# Altium PCB DC-Motor-Driver-v1.0.PcbDoc (part 2 of 5)
Units mil, origin at the board's own origin, x right, y up, seen from the top; angles counter-clockwise.
Board outline 1968.5 x 1574.8 mil, 4 copper layers (Top Layer, Signal 1, Signal 2, Bottom Layer), stack 62.055 mil thick; 133 components, 124 nets, 619 pads, 342 vias.
Unrouted connection lines stored in the file: 5.
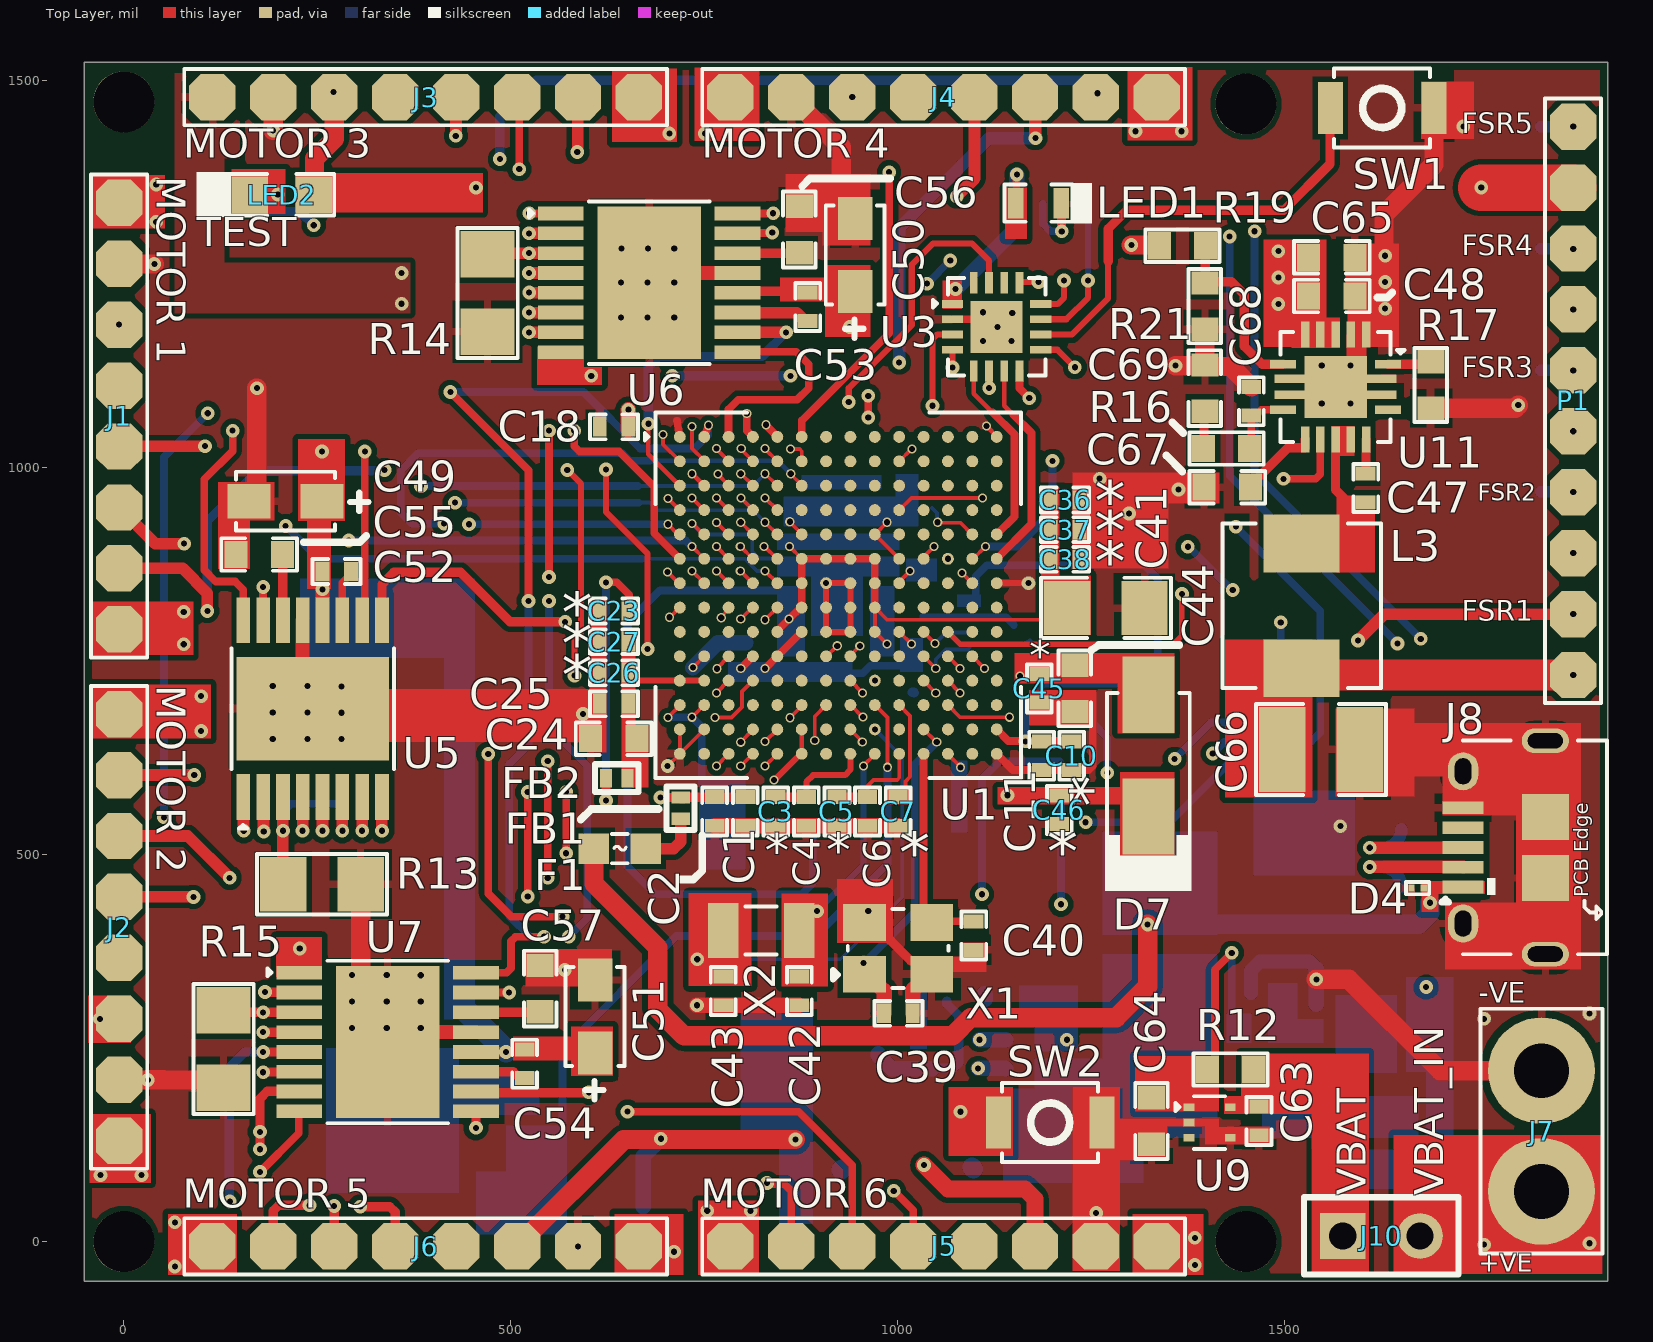
[diagram p0: Top Layer view]

## Part data (continued)
D2 D5: "Schottky Barrier Diode SK36, DO-214AB, 3A/60V", Average Rectified Current=3A, Case/Package=SMC, Forward Voltage=750mV, LCSC Part Number=C16015, Manufacturer="ON Semiconductor / Fairchild", Max Forward Surge Current (Ifsm)=100A, Max Operating Temperature=150°C, Max Repetitive Reverse Voltage (Vrrm)=60V, Max Reverse Current=500uA, Min Operating Temperature=-55°C, Package Quantity=3000, Power Dissipation=2.27W, Supplier Part Number 1=9034425P, Category="Schottky Diodes", ComponentLink1Description=https://datasheet.ciiva.com/4714/ss36-197193-4714610.pdf?src-supplier=Mouser, ComponentLink1URL=https://datasheet.ciiva.com/4714/ss36-197193-4714610.pdf?src-supplier=Mouser, ComponentLink2Description=https://datasheet.ciiva.com/16889/ss36-16889545.pdf?src-supplier=Future+Electronics, ComponentLink2URL=https://datasheet.ciiva.com/16889/ss36-16889545.pdf?src-supplier=Future+Electronics, ComponentLink3Description=https://datasheet.ciiva.com/920/ss34-920433.pdf?src-supplier=Digi-Key, ComponentLink3URL=https://datasheet.ciiva.com/920/ss34-920433.pdf?src-supplier=Digi-Key, ComponentLink4Description=https://datasheet.ciiva.com/920/ss34-920434.pdf?src-supplier=Digi-Key, ComponentLink4URL=https://datasheet.ciiva.com/920/ss34-920434.pdf?src-supplier=Digi-Key, ComponentLink5Description=https://datasheet.ciiva.com/920/ss34-920435.pdf?src-supplier=Digi-Key, ComponentLink5URL=https://datasheet.ciiva.com/920/ss34-920435.pdf?src-supplier=Digi-Key, Current=3A, Current Rating=3A, Element Configuration=Single, Forward Current=3A, Item Type=Diode, Lead Free="Lead Free", Manufacturer Part Number=SS36, Max Reverse Leakage Current=500uA, Max Reverse Voltage (DC)=60V, Max Surge Current=100A, Mount="Surface Mount", Number of Pins=2, Output Current=3A, Packaging="Tape and Reel", Peak Non-Repetitive Surge Current=100A, Polarity=Standard, Pricing 1="100=0.43800, 500=0.34200, 1000=0.27800, 3000=0.25000 (GBP)", Radiation Hardening=No, Reach SVHC Compliant=Yes, RoHS=Yes, RoHS Compliant=Yes, Series=-, Stock 1=100, Supplier 1=Rs, Voltage=60V, Voltage Rating (DC)=60V
D3: "16A 20V 7V 5V@Max Unidirectional SOT-23 TVS ROHS", LCSC Part Number=C239643, Manufacturer=WILLSEMI, Package=SOT-23, ComponentLink1Description=LCSC, ComponentLink1URL=https://www.lcsc.com/product-detail/TVS_WILLSEMI-Will-Semicon-ESD5302F-3-TR_C239643.html, Item Type=Diode, Manufacturer Part Number=ESD5302F-3/TR
D4: "TVS DIODE 5VWM 6.3VC DSN0603-2", LCSC Part Number=C477989, Manufacturer=Nexperia, Category="ESD and Circuit Protection ICs", ComponentLink1Description=http://www.farnell.com/datasheets/1961312.pdf?src-supplier=Farnell, ComponentLink1URL=http://www.farnell.com/datasheets/1961312.pdf?src-supplier=Farnell, ComponentLink2Description=https://assets.nexperia.com/documents/data-sheet/PESD5V0H1BSF.pdf?src-supplier=Digi-Key, ComponentLink2URL=https://assets.nexperia.com/documents/data-sheet/PESD5V0H1BSF.pdf?src-supplier=Digi-Key, ComponentLink3Description=http://www.farnell.com/datasheets/1961312.pdf?src-supplier=Newark, ComponentLink3URL=http://www.farnell.com/datasheets/1961312.pdf?src-supplier=Newark, Item Type=Diode, Manufacturer Part Number=PESD5V0H1BSFYL, Pricing 1="18000=0.06453, 36000=0.06278, 54000=0.06104, 90000=0.05930, 180000=0.05755, 900000=0.05581, 1800000=0.05406 (USD)", RoHS=Yes, RoHS Compliant=Yes, Stock 1=9000, Supplier 1=Avnet, Supplier Part Number 1=PESD5V0H1BSFYL
D6: "Single 3.01V~3.22V 500mW 3.1V SOD-123 Zener Diodes ROHS", LCSC Part Number=C2972805, Manufacturer=LRC, Package=SOD-123, ComponentLink1Description=LCSC, Item Type=Diode, Manufacturer Part Number=LBZT52B3V0T1G
F1: "6V 500mA 40A 1A 0603 Resettable Fuses ROHS", LCSC Part Number=C69679, Manufacturer=TECHFUSE, Category=Uncategorized, ComponentLink1Description=LCSC, ComponentLink1URL=https://www.lcsc.com/product-detail/Resettable-Fuses_TECHFUSE-SMD0603-050_C69679.html, Item Type=Fuse, Manufacturer Part Number=SMD0603-050, RoHS=No, Supplier 1=LCSC, Supplier Part Number 1=C69679
FB1 FB2: "FERRITE BEAD 120 OHM 0402 1LN", Case Code (Imperial)=0402, Case Code (Metric)=1005, Current Rating=1.3A, DC Resistance (DCR)=90mR, LCSC Part Number=C76891, Manufacturer=Murata, Max Operating Temperature=125°C, Min Operating Temperature=-55°C, Package Quantity=1, Test Frequency=100MHz, Tolerance=25%, Case/Package=0402, Category="Ferrite Beads and Chips", ComponentLink1Description=https://datasheet.ciiva.com/11800/0900766b811b5866-11800860.pdf?src-supplier=RSComponents, ComponentLink1URL=https://datasheet.ciiva.com/11800/0900766b811b5866-11800860.pdf?src-supplier=RSComponents, ComponentLink2Description=https://datasheet.ciiva.com/18093/getdatasheetpartid-195858-18093157.pdf?src-supplier=Verical, ComponentLink2URL=https://datasheet.ciiva.com/18093/getdatasheetpartid-195858-18093157.pdf?src-supplier=Verical, ComponentLink3Description=https://datasheet.ciiva.com/41425/001171686-da-01-en-chip-drossel0402-120r-1300ma-1-0x0-5mm-41425776.pdf?src-supplier=Conrad, ComponentLink3URL=https://datasheet.ciiva.com/41425/001171686-da-01-en-chip-drossel0402-120r-1300ma-1-0x0-5mm-41425776.pdf?src-supplier=Conrad, ComponentLink4Description=https://datasheet.ciiva.com/41449/001172205-da-01-en-drossel-0402-120r-11-0x0-5mm-10000st-41449495.pdf?src-supplier=Conrad, ComponentLink4URL=https://datasheet.ciiva.com/41449/001172205-da-01-en-drossel-0402-120r-11-0x0-5mm-10000st-41449495.pdf?src-supplier=Conrad, ComponentLink5Description=https://datasheet.ciiva.com/1012/l0110e-1012435.pdf?src-supplier=Digi-Key, ComponentLink5URL=https://datasheet.ciiva.com/1012/l0110e-1012435.pdf?src-supplier=Digi-Key, ComponentLink6Description=https://datasheet.ciiva.com/1012/l0110e-1012434.pdf?src-supplier=Digi-Key, ComponentLink6URL=https://datasheet.ciiva.com/1012/l0110e-1012434.pdf?src-supplier=Digi-Key, ComponentLink7Description=https://datasheet.ciiva.com/1012/l0110e-1012436.pdf?src-supplier=Digi-Key, ComponentLink7URL=https://datasheet.ciiva.com/1012/l0110e-1012436.pdf?src-supplier=Digi-Key, Core Material=Ferrite, DC Current=1.3A, DC Resistance-Max=90mR, Depth=0.55mm, Height=0.5mm, Impedance=120R, Item Type="Ferrite Bead", Lead Free="Lead Free", Length=1mm, Manufacturer Part Number=BLM15PD121SN1D, Material=Steel,Ferrite, Max Current Rating=1.3A, Max DC Current=1.3A, Military Standard=Not, Number of Circuits=1, Number of Lines=1, Number of Pins=2, Packaging="Tape and Reel", Pricing 1="10000=0.03238, 20000=0.03063, 40000=0.02888, 60000=0.02713, 80000=0.02538, 100000=0.02363, 1000000=0.02188 (USD)", Radiation Hardening=No, Reach SVHC Compliant=Yes, RoHS=Yes, RoHS Compliant=Yes, Series=BLM15PD, Stock 1=300000, Supplier 1=Avnet, Supplier Part Number 1=BLM15PD121SN1D, Termination=SMD/SMT, Width=0.5mm
J7: library part "Through Hole Pads 2", "3.96mm Pitch Through Hole Pads 2", Item Type="Through Hole Pads", Manufacturer Part Number="Through Hole Pads 2"
J8: "CONN RCPT USB2.0 MICRO B SMD R/A", Color=Black, Current Rating=1.8A, Flammability Rating="UL94 V-0", Insulation Resistance=1GR, LCSC Part Number=C132563, Manufacturer="Amphenol FCI", Max Operating Temperature=85°C, Max Voltage Rating (AC)=100V, Min Operating Temperature=-55°C, Package Quantity=9600, Supplier Part Number 1=609-4618-1-ND, ComponentLink1Description=http://www.amphenol-icc.com/media/wysiwyg/files/drawing/10118194.pdf?src-supplier=Digi-Key, ComponentLink1URL=http://www.amphenol-icc.com/media/wysiwyg/files/drawing/10118194.pdf?src-supplier=Digi-Key, ComponentLink2Description=https://cdn.amphenol-icc.com/media/wysiwyg/files/drawing/10118194.pdf?src-supplier=Mouser, ComponentLink2URL=https://cdn.amphenol-icc.com/media/wysiwyg/files/drawing/10118194.pdf?src-supplier=Mouser, ComponentLink3Description=https://cdn.amphenol-icc.com/media/wysiwyg/files/drawing/10118194.pdf?src-supplier=Verical, ComponentLink3URL=https://cdn.amphenol-icc.com/media/wysiwyg/files/drawing/10118194.pdf?src-supplier=Verical, Connector Type=USB,Receptacle, Contact Material="Copper Alloy", Contact Plating=Gold, Depth=5mm, Features=Shielded, Gender=Receptacle, Housing Material=Polymer, Item Type="USB B Connector", Lead Free="Lead Free", Length=8.05mm, Manufacturer Part Number=10118194-0001LF, Mount="Surface Mount,Horizontal", Number of Contacts=5, Number of Ports=1, Number of Terminals=5, Orientation="Right Angle", Packaging="Tape and Reel", Pitch=0.65mm, Pricing 1="1=0.43, 10=0.405, 25=0.3648, 50=0.3242, 100=0.3107, 250=0.28368, 500=0.27016 (USD)", Radiation Hardening=No, Stock 1=35943, Supplier 1=Digi-Key, Termination=Solder
J9: "Battery base CR2032 SMD Battery Connectors ROHS", LCSC Part no=C70377, Manufacturer=Q&J, ComponentLink1Description=LCSC, ComponentLink1URL=https://www.lcsc.com/product-detail/Battery-Connectors_Q-J-CR2032-BS-6-1_C70377.html, Item Type=Connector, Manufacturer Part no=CR2032-BS-6-1
J10: "CONN HEADER VERT 2POS 2.54MM", Color=Green, Current Rating=3A, Flammability Rating="UL94 V-0", High Temperature Housing=No, LCSC Part Number=C86471, Manufacturer="TE Connectivity", Manufacturer Part Number=8266292, Max Operating Temperature=105°C, Min Operating Temperature=-65°C, Package Quantity=3000, Supplier Part Number 1=1361864, Board Standoff="No (Without)", Category="Board to Board Connectors", ComponentLink1Description=https://datasheet.ciiva.com/11746/0900766b80d7c358-11746248.pdf?src-supplier=RSComponents, ComponentLink1URL=https://datasheet.ciiva.com/11746/0900766b80d7c358-11746248.pdf?src-supplier=RSComponents, ComponentLink2Description=https://datasheet.ciiva.com/30224/8266292-30224019.pdf?src-supplier=Onlinecomponents.com, ComponentLink2URL=https://datasheet.ciiva.com/30224/8266292-30224019.pdf?src-supplier=Onlinecomponents.com, ComponentLink3Description=https://datasheet.ciiva.com/29369/001094754-da-01-en-stiftleiste-1-reihig-0-0826629-2-29369600.pdf?src-supplier=Conrad, ComponentLink3URL=https://datasheet.ciiva.com/29369/001094754-da-01-en-stiftleiste-1-reihig-0-0826629-2-29369600.pdf?src-supplier=Conrad, ComponentLink4Description=https://datasheet.ciiva.com/6857/eng-cd-826629-aa-basefilename-6857135.pdf?src-supplier=Digi-Key, ComponentLink4URL=https://datasheet.ciiva.com/6857/eng-cd-826629-aa-basefilename-6857135.pdf?src-supplier=Digi-Key, ComponentLink5Description=https://datasheet.ciiva.com/14120/eh826629-draw-14120837.pdf?src-supplier=Distrelec, ComponentLink5URL=https://datasheet.ciiva.com/14120/eh826629-draw-14120837.pdf?src-supplier=Distrelec, Connector Type=Plug,Header,Pin, Contact Gender=Male, Contact Material=Bronze, Contact Mating Length=6.7mm, Contact Plating=Gold,Tin, Contact Post Length=0.1259inch, Contact Protection="No (Without)", Contact Shape=Square, Contact Type="Male Pin", Depth=2.5mm, ELV=Compliant, Gasket="No (Without)", Gender=Male, High Speed Serial Data Connector=No, Housing Color=Green, Housing Material=PBT, Item Type="Male Header", Keyed=No, Lead Free="Lead Free", Length=5.08mm, Mating Alignment="No (Without)", Mating Connector Lock="No (Without)", Mount="Straddle Mount", Number of Contacts=2, Number of Positions=2, Number of Rows=1, Orientation=Straight, Packaging=Carton, PCB Mount Retention=Without, PCB Mounting Orientation=Vertical, Pitch=2.54mm, Plating Thickness=0.8um, Radiation Hardening=No, REACH SVHC="No SVHC", RoHS=Yes, Row Spacing=2.54mm, Selectively Loaded="No (Without)", Series="AMPMODU MOD II", Stabilizers="No (Without)", Strain Relief="No (Without)", Supplier 1=RSComponents, Termination="Through Hole"
L1: library part DFE322512F-4R7M=P2, "FIXED IND 4.7UH 1.6A 157MOHM SMD", LCSC Part Number=C703083, Manufacturer=Murata, Manufacturer Part Number=DFE322512F-4R7M=P2, Supplier Part Number 1=490-DFE322512F-4R7M=P2CT-ND, Category="Fixed Inductors", Item Type=Inductor, Pricing 1="1=0.61, 10=0.533, 25=0.4952, 50=0.4188, 100=0.3808, 250=0.35792, 500=0.31984, 1000=0.25892 (USD)", RoHS=Yes, RoHS Compliant=Yes, Stock 1=4687, Supplier 1=Digi-Key
L2: library part SWPA5020S3R9NT, "FIXED IND 3.9UH 2.5A 56MOHM SMD", LCSC Part Number=C115009, Manufacturer=Sunlord, Supplier Part Number=3442-SWPA5020S3R9NTTR-ND, Category="Fixed Inductors", Item Type=Inductor, Manufacturer Part Number=SWPA5020S3R9NT, Pricing="2500=0.21917 (USD)", RoHS=No, Supplier=Digi-Key
L3: library part PSPMAA0503-2R2M-ANP, "5.5A 2.2uH ±20% 7.5A SMD,5.2x5.4x3mm Power Inductors ROHS", LCSC Part Number=C436533, Manufacturer="PROD Tech", Package=SMD,5.2x5.4x3mm, ComponentLink1Description=LCSC, ComponentLink1URL=https://www.lcsc.com/product-detail/Power-Inductors_PROD-Tech-PSPMAA0503-2R2M-ANP_C436533.html, Item Type=Inductor, Manufacturer Part Number=PSPMAA0503-2R2M-ANP
LED1: library part NCD0603R3, "RED LED 0603 Light Emitting Diodes", LCSC Part Number=C3151730, Manufacturer="Foshan NationStar Optoelectronics", Package=0603, ComponentLink1Description=LCSC, ComponentLink1URL=https://www.lcsc.com/product-detail/Light-Emitting-Diodes-LED_Foshan-NationStar-Optoelectronics-NCD0603R3_C3151730.html, Item Type=LED, Manufacturer Part Number=NCD0603R3
LED2: library part XL-2012UOC, "Colorless transparence -30℃~+85℃ 601nm~603nm Positive post Orange 120° 55mW 0805 Light Emitting Diodes (LED) ROHS", LCSC Part no=C965813, Manufacturer=XINGLIGHT, Package=0805, Manufacture Part No=XL-2012UOC
Q1: "30V 4.1A 60mΩ@10V,4.1A 350mW 3V@250uA P Channel SOT-23 MOSFETs ROHS", LCSC Part Number=C181093, Manufacturer="Guangdong Hottech", Package=SOT-23, ComponentLink1Description=LCSC, ComponentLink1URL=https://www.lcsc.com/product-detail/MOSFETs_Guangdong-Hottech-AO3407_C181093.html, Item Type=Mosfet, Manufacturer Part Number=AO3407
Q2: "40V 100mW 100@10mA,1V 200mA 300MHz 300mV@50mA,5mA NPN -55℃~+150℃@(Tj) SOT-723 Bipolar Transistors - BJT ROHS", LCSC Part Number=C2923360, Manufacturer="TECH PUBLIC", Package=SOT-723, ComponentLink1Description=LCSC, ComponentLink1URL=https://www.lcsc.com/product-detail/Bipolar-Transistors-BJT_TECH-PUBLIC-MMBT3904M_C2923360.html, Item Type=Mosfet, Manufacturer Part Number=MMBT3904M
R1 R22: library part RC0201JR-07470RL, "RES 470 OHM 5% 1/20W 0201", Case Code (Imperial)=0201, Case Code (Metric)=0603, LCSC Part Number=C163491, Manufacturer=Yageo, Max Operating Temperature=125°C, Max Power Dissipation=50mW, Min Operating Temperature=-55°C, Package Quantity=1, Resistor Type="Thick Film", Supplier Part Number 1=311-470NCT-ND, Temperature Coefficient=200ppm/°C, Tolerance=5%, Voltage Rating=25V, Case/Package=0201, Category="Chip SMD Resistors", ComponentLink1Description=https://datasheet.ciiva.com/5924/443682-5924928.pdf?src-supplier=Farnell, ComponentLink1URL=https://datasheet.ciiva.com/5924/443682-5924928.pdf?src-supplier=Farnell, ComponentLink2Description=https://datasheet.ciiva.com/8885/pyu-rc0201-51-rohs-l-8-8885600.pdf?src-supplier=Avnet, ComponentLink2URL=https://datasheet.ciiva.com/8885/pyu-rc0201-51-rohs-l-8-8885600.pdf?src-supplier=Avnet, ComponentLink3Description=https://datasheet.ciiva.com/28390/pyu-rc0201-51-rohs-l-8-28390376.pdf?src-supplier=Avnet+Europe, ComponentLink3URL=https://datasheet.ciiva.com/28390/pyu-rc0201-51-rohs-l-8-28390376.pdf?src-supplier=Avnet+Europe, ComponentLink4Description=https://datasheet.ciiva.com/8885/pyu-rc0201-51-rohs-l-8-8885642.pdf?src-supplier=Avnet, ComponentLink4URL=https://datasheet.ciiva.com/8885/pyu-rc0201-51-rohs-l-8-8885642.pdf?src-supplier=Avnet, ComponentLink5Description=https://datasheet.ciiva.com/2462/pyu-r-int-thick-7-2462802.pdf?src-supplier=Digi-Key, ComponentLink5URL=https://datasheet.ciiva.com/2462/pyu-r-int-thick-7-2462802.pdf?src-supplier=Digi-Key, ComponentLink6Description=https://datasheet.ciiva.com/2462/pyu-r-int-thick-7-2462803.pdf?src-supplier=Digi-Key, ComponentLink6URL=https://datasheet.ciiva.com/2462/pyu-r-int-thick-7-2462803.pdf?src-supplier=Digi-Key, ComponentLink7Description=https://datasheet.ciiva.com/2462/pyu-r-int-thick-7-2462804.pdf?src-supplier=Digi-Key, ComponentLink7URL=https://datasheet.ciiva.com/2462/pyu-r-int-thick-7-2462804.pdf?src-supplier=Digi-Key, Contact Plating=Tin,Matte, Depth=0.3mm, Features="Moisture Resistant", Height=0.01inch, Lead Free="Lead Free", Length=0.6mm, Manufacturer Part Number=RC0201JR-07470RL, Military Standard=Not, Number of Pins=2, Number of Terminations=2, Packaging="Tape and Reel", Power Rating=50mW, Pricing 1="1=0.10000, 10=0.02600, 100=0.01040, 1000=0.00466, 2500=0.00405, 5000=0.00334 (USD)", Radiation Hardening=No, REACH SVHC="No SVHC", Resistance=470R, RoHS=Yes, Stock 1=173754, Supplier 1=Digi-Key, Termination=SMD/SMT, Voltage Rating (DC)=25V, Width=0.3mm
R2 R21: library part RT0603BRD07100KL, "RES SMD 100K OHM 0.1% 1/10W 0603", Case Code (Imperial)=0603, Case Code (Metric)=1608, LCSC Part Number=C122538, Manufacturer=Yageo, Max Operating Temperature=125°C, Max Power Dissipation=100mW, Min Operating Temperature=-55°C, Package Quantity=5000, Resistance=100kR, Supplier Part Number 1=YAG1235CT-ND, Temperature Coefficient=25ppm/°C, Tolerance=0.1%, Voltage Rating=75V, Case/Package=0603, ComponentLink1Description=http://documents.rs-components.com/techlib://itc_doclist_GB.htm?stockno=6174810&src-supplier=RSComponents, ComponentLink1URL=http://documents.rs-components.com/techlib://itc_doclist_GB.htm?stockno=6174810&src-supplier=RSComponents, Composition="Thin Film", Depth=0.8mm, Features="Moisture Resistant", Height=0.022inch, Item Type=Resistor, Lead Free="Lead Free", Length=1.6mm, Manufacturer Part Number=RT0603BRD07100KL, Military Standard=Not, Mount="Surface Mount", Number of Terminations=2, Packaging="Tape and Reel", Power Rating=100mW, Pricing 1="1=0.39, 10=0.332, 100=0.1298, 1000=0.05435, 2500=0.04982 (USD)", Stock 1=53395, Supplier 1=Digi-Key, Termination=SMD/SMT, Voltage Rating (DC)=75V, Width=0.031inch, Working Voltage=75V
R3 R4 R5 R6 R7: library part RT0402BRD072K87L, "RES SMD 2.87KOHM 0.1% 1/16W 0402", LCSC Part Number=C852707, Manufacturer=Yageo, Supplier Part Number 1=2128457, Category="Chip SMD Resistors", ComponentLink1Description=https://datasheet.ciiva.com/2582/pyu-rt-1-to-0-05-rohs-l-5-2582296.pdf?src-supplier=Digi-Key, ComponentLink1URL=https://datasheet.ciiva.com/2582/pyu-rt-1-to-0-05-rohs-l-5-2582296.pdf?src-supplier=Digi-Key, Item Type=Resistor, Manufacturer Part Number=RT0402BRD072K87L, Pricing 1="10000=0.0185, 20000=0.0181, 40000=0.0177, 50000=0.0176, 150000=0.0168 (USD)", RoHS=Yes, Stock 1=10000, Supplier 1="Future Electronics"
R8 R18: library part RC0402FR-0710KL, "RES 10K OHM 1% 1/16W 0402", Case Code (Imperial)=0402, Case Code (Metric)=1005, LCSC Part Number=C60490, Manufacturer=Yageo, Max Operating Temperature=155°C, Max Power Dissipation=63mW, Min Operating Temperature=-55°C, Power Rating=62.5mW, Resistance=10kR, Resistance Tolerance=1%, Resistor Type="Thick Film", Supplier Part Number 1=603-RC0402FR-0710KL, Temperature Coefficient=100ppm/°C, Voltage Rating=50V, Case/Package=0402, Category="Chip SMD Resistors", ComponentLink1Description=https://datasheet.ciiva.com/7660/38568-7660787.pdf?src-supplier=Element14, ComponentLink1URL=https://datasheet.ciiva.com/7660/38568-7660787.pdf?src-supplier=Element14, ComponentLink2Description=https://datasheet.ciiva.com/7849/1686128-7849814.pdf?src-supplier=Element14, ComponentLink2URL=https://datasheet.ciiva.com/7849/1686128-7849814.pdf?src-supplier=Element14, ComponentLink3Description=https://datasheet.ciiva.com/7983/1018594-7983486.pdf?src-supplier=Element14, ComponentLink3URL=https://datasheet.ciiva.com/7983/1018594-7983486.pdf?src-supplier=Element14, ComponentLink4Description=https://datasheet.ciiva.com/22747/1018594-22747512.pdf?src-supplier=Element14, ComponentLink4URL=https://datasheet.ciiva.com/22747/1018594-22747512.pdf?src-supplier=Element14, ComponentLink5Description=https://datasheet.ciiva.com/12667/pyu-rc0402-51-rohs-l-6-r-12667067.pdf?src-supplier=Mouser, ComponentLink5URL=https://datasheet.ciiva.com/12667/pyu-rc0402-51-rohs-l-6-r-12667067.pdf?src-supplier=Mouser, ComponentLink6Description=https://datasheet.ciiva.com/7849/1784430-7849813.pdf?src-supplier=Element14, ComponentLink6URL=https://datasheet.ciiva.com/7849/1784430-7849813.pdf?src-supplier=Element14, ComponentLink7Description=https://datasheet.ciiva.com/7849/1784430-7849815.pdf?src-supplier=Element14, ComponentLink7URL=https://datasheet.ciiva.com/7849/1784430-7849815.pdf?src-supplier=Element14, Construction=Rectangular, Depth=0.5mm, Features="Moisture Resistant", Height=0.32mm, Item Type=Resistor, Lead Free="Lead Free", Lead Pitch=0.2mm, Length=1mm, Manufacturer Part Number=RC0402FR-0710KL, Military Standard=Not, Number of Pins=2, Number of Terminations=2, Packaging="Tape and Reel", Pricing 1="1=0.10000, 10=0.01400, 50=0.01400, 100=0.00500, 1000=0.00300, 10000=0.00200 (USD)", REACH SVHC="No SVHC", RoHS=Yes, RoHS Compliant=Yes, Series=RC, Stock 1=18648329, Supplier 1=Mouser, Termination=SMD/SMT, Tolerance=1%, Voltage Rating (DC)=50V, Width=0.5mm, Working Voltage=50V
R9: library part RC0603FR-071KL, "RES SMD 1K OHM 1% 1/10W 0603", Case Code (Imperial)=0603, Case Code (Metric)=1608, LCSC Part Number=C22548, Manufacturer=Yageo, Max Operating Temperature=155°C, Min Operating Temperature=-55°C, Power Rating=100mW, Resistance=1kR, Supplier Part Number 1=311-1.00KHRDKR-ND, Temperature Coefficient=100ppm/°C, Tolerance=1%, Voltage Rating=50V, Case/Package=0603, ComponentLink1Description=https://www.verical.com/server-webapp/html/getDatasheet?partID=409289&src-supplier=Verical, ComponentLink1URL=https://www.verical.com/server-webapp/html/getDatasheet?partID=409289&src-supplier=Verical, ComponentLink2Description=http://documents.rs-components.com/techlib://itc_doclist_GB.htm?stockno=5048928&src-supplier=RSComponents, ComponentLink2URL=http://documents.rs-components.com/techlib://itc_doclist_GB.htm?stockno=5048928&src-supplier=RSComponents, ComponentLink3Description=http://www.yageo.com/documents/recent/PYu-RC0603_51_RoHS_L_4.pdf?src-supplier=Avnet+Europe, ComponentLink3URL=http://www.yageo.com/documents/recent/PYu-RC0603_51_RoHS_L_4.pdf?src-supplier=Avnet+Europe, ComponentLink4Description=http://www.farnell.com/datasheets/2167052.pdf?src-supplier=Element14, ComponentLink4URL=http://www.farnell.com/datasheets/2167052.pdf?src-supplier=Element14, ComponentLink5Description=http://www.farnell.com/datasheets/1868787.pdf?src-supplier=Element14, ComponentLink5URL=http://www.farnell.com/datasheets/1868787.pdf?src-supplier=Element14, ComponentLink6Description=http://www.yageo.com/documents/recent/PYu-RC_Group_51_RoHS_L_2.pdf?src-supplier=Avnet, ComponentLink6URL=http://www.yageo.com/documents/recent/PYu-RC_Group_51_RoHS_L_2.pdf?src-supplier=Avnet, ComponentLink7Description=https://www.verical.com/server-webapp/html/getDatasheet?partID=404327&src-supplier=Verical, ComponentLink7URL=https://www.verical.com/server-webapp/html/getDatasheet?partID=404327&src-supplier=Verical, ComponentLink8Description=http://www.farnell.com/datasheets/443971.pdf?src-supplier=Element14, ComponentLink8URL=http://www.farnell.com/datasheets/443971.pdf?src-supplier=Element14, Composition="Thick Film", Contact Plating=Tin,Matte, Depth=0.8mm, Height=0.45mm, Item Type=Resistor, Lead Free="Lead Free", Length=1.6mm, Manufacturer Part Number=RC0603FR-071KL, Military Standard=Not, Packaging="Tape and Reel", Pricing 1="1=0.1, 10=0.023, 100=0.0094, 1000=0.0042, 2500=0.0037 (USD)", Radiation Hardening=No, REACH SVHC="No SVHC", Stock 1=21472395, Supplier 1=Digi-Key, Termination=SMD/SMT
R10 R11 R12: library part RC0603JR-074K7L, "RES SMD 4.7K OHM 5% 1/10W 0603", Case Code (Imperial)=0603, Case Code (Metric)=1608, LCSC Part Number=C105428, Manufacturer=Yageo, Max Operating Temperature=155°C, Min Operating Temperature=-55°C, Power Rating=100mW, Resistance=4.7kR, Supplier Part Number 1=311-4.7KGRCT-ND, Temperature Coefficient=100ppm/°C, Tolerance=5%, Voltage Rating=50V, Case/Package=0603, ComponentLink1Description=http://www.farnell.com/datasheets/443971.pdf?src-supplier=Element14, ComponentLink1URL=http://www.farnell.com/datasheets/443971.pdf?src-supplier=Element14, Composition="Thick Film", Depth=0.8mm, Item Type=Resistor, Lead Free="Lead Free", Length=1.6mm, Manufacturer Part Number=RC0603JR-074K7L, Military Standard=Not, Number of Pins=2, Packaging="Tape and Reel", Pricing 1="1=0.1, 10=0.02, 100=0.0081, 1000=0.00362, 2500=0.00314 (USD)", REACH SVHC="No SVHC", Stock 1=19706643, Supplier 1=Digi-Key, Termination=SMD/SMT, Voltage Rating (DC)=50V, Width=0.8mm
R13 R14 R15: library part 1206W4F330LT5E, "250mW Thick Film Resistors ±800ppm/℃ ±1% 330mΩ 1206 Chip Resistor", LCSC Part Number=C25337, Manufacturer=Uniroyal, ComponentLink1Description="New link", ComponentLink1URL=https://www.lcsc.com/product-detail/Chip-Resistor-Surface-Mount_UNI-ROYAL-Uniroyal-Elec-1206W4F330LT5E_C25337.html, Item Type=Resistor, Manufacturer Part Number=1206W4F330LT5E
R16: library part RC0603FR-073K9L, "RES 3.9K OHM 1% 1/10W 0603", Case Code (Imperial)=0603, Case Code (Metric)=1608, LCSC Part Number=C114616, Manufacturer=Yageo, Max Operating Temperature=155°C, Max Power Dissipation=100mW, Min Operating Temperature=-55°C, Package Quantity=1, Resistance=3.9kR, Resistance Tolerance=1%, Resistor Type="Thick Film", Supplier Part Number 1=1995566P, Temperature Coefficient=100ppm/°C, Voltage Rating=50V, Case/Package=0603, Category="Chip SMD Resistors", ComponentLink1Description=https://datasheet.ciiva.com/11819/0900766b80f96399-11819346.pdf?src-supplier=RSComponents, ComponentLink1URL=https://datasheet.ciiva.com/11819/0900766b80f96399-11819346.pdf?src-supplier=RSComponents, ComponentLink2Description=https://datasheet.ciiva.com/2455/pyu-r-int-thick-7-2455362.pdf?src-supplier=Digi-Key, ComponentLink2URL=https://datasheet.ciiva.com/2455/pyu-r-int-thick-7-2455362.pdf?src-supplier=Digi-Key, ComponentLink3Description=https://datasheet.ciiva.com/2455/pyu-r-int-thick-7-2455363.pdf?src-supplier=Digi-Key, ComponentLink3URL=https://datasheet.ciiva.com/2455/pyu-r-int-thick-7-2455363.pdf?src-supplier=Digi-Key, ComponentLink4Description=https://datasheet.ciiva.com/2455/pyu-r-int-thick-7-2455364.pdf?src-supplier=Digi-Key, ComponentLink4URL=https://datasheet.ciiva.com/2455/pyu-r-int-thick-7-2455364.pdf?src-supplier=Digi-Key, ComponentLink5Description=https://datasheet.ciiva.com/7983/443971-7983640.pdf?src-supplier=Element14, ComponentLink5URL=https://datasheet.ciiva.com/7983/443971-7983640.pdf?src-supplier=Element14, ComponentLink6Description=https://datasheet.ciiva.com/12558/rc0603-272842-12558649.pdf?src-supplier=Mouser, ComponentLink6URL=https://datasheet.ciiva.com/12558/rc0603-272842-12558649.pdf?src-supplier=Mouser, ComponentLink7Description=https://datasheet.ciiva.com/7746/443971-7746347.pdf?src-supplier=Element14, ComponentLink7URL=https://datasheet.ciiva.com/7746/443971-7746347.pdf?src-supplier=Element14, ComponentLink8Description=https://datasheet.ciiva.com/7746/443971-7746348.pdf?src-supplier=Element14, ComponentLink8URL=https://datasheet.ciiva.com/7746/443971-7746348.pdf?src-supplier=Element14, ComponentLink9Description=https://datasheet.ciiva.com/15189/getdatasheetpartid-323794-15189725.pdf?src-supplier=Verical, ComponentLink9URL=https://datasheet.ciiva.com/15189/getdatasheetpartid-323794-15189725.pdf?src-supplier=Verical, Construction=Rectangular, Depth=0.8mm, Features="Moisture Resistant", Height=0.45mm, Lead Free="Lead Free", Length=1.6mm, Manufacturer Part Number=RC0603FR-073K9L, Military Standard=Not, Number of Pins=2, Number of Terminations=2, Packaging="Tape and Reel", Power Rating=100mW, Pricing 1="500=0.00600, 1000=0.00500, 2500=0.00500, 5000=0.00400 (GBP)", REACH SVHC="No SVHC", RoHS=Yes, RoHS Compliant=Yes, Series=RC, Size Code=0603, Stock 1=100, Supplier 1=RSComponents, Technology="THICK FILM", Termination=SMD/SMT, Tolerance=1%, Voltage Rating (DC)=50V, Width=0.8mm
R17: library part AC0603FR-0756KL, "RES SMD 56K OHM 1% 1/10W 0603", LCSC Part Number=C144647, Manufacturer=Yageo, Supplier Part Number=4073924, Category="Chip SMD Resistors", ComponentLink1Description=http://www.mouser.com/ds/2/447/yageodocoutput-1111992.pdf?src-supplier=Mouser, ComponentLink1URL=http://www.mouser.com/ds/2/447/yageodocoutput-1111992.pdf?src-supplier=Mouser, ComponentLink2Description=http://www.yageo.com/NewPortal/yageodocoutput?fileName=/pdf/R-Chip/PYu-AC_51_RoHS_L_6.pdf&src-supplier=Digi-Key, ComponentLink2URL=http://www.yageo.com/NewPortal/yageodocoutput?fileName=/pdf/R-Chip/PYu-AC_51_RoHS_L_6.pdf&src-supplier=Digi-Key, ComponentLink3Description=https://datasheet.octopart.com/AC0603FR-0756KL-Yageo-datasheet-151884373.pdf?src-supplier=Future+Electronics, ComponentLink3URL=https://datasheet.octopart.com/AC0603FR-0756KL-Yageo-datasheet-151884373.pdf?src-supplier=Future+Electronics, Item Type=Resistor, Manufacturer Part Number=AC0603FR-0756KL, Pricing="5000=0.0016, 25000=0.0015, 150000=0.0014, 500000=0.0014, 1500000=0.0013 (USD)", RoHS=Yes, Stock=100000, Supplier="Future Electronics"
R19: library part RT0603BRD07649KL, "RES SMD 649K OHM 0.1% 1/10W 0603", Case Code (Imperial)=0603, Case Code (Metric)=1608, Manufacturer=Yageo, Max Operating Temperature=155°C, Max Power Dissipation=100mW, Min Operating Temperature=-55°C, Supplier Part Number=RT0603BRD07649KL-ND, Temperature Coefficient=25ppm/°C, Tolerance=0.1%, Voltage Rating=75V, Case/Package=0603, Category="Chip SMD Resistors", ComponentLink1Description=https://datasheet.ciiva.com/12725/pyu-rt-1-to-0-05-rohs-l-4-12725853.pdf?src-supplier=Mouser, ComponentLink1URL=https://datasheet.ciiva.com/12725/pyu-rt-1-to-0-05-rohs-l-4-12725853.pdf?src-supplier=Mouser, Features="Moisture Resistant", Height=0.022inch, Length=0.063inch, Manufacturer Part Number=RT0603BRD07649KL, Number of Terminations=2, Packaging="Tape and Reel", Power Rating=100mW, Pricing="5000=0.03492 (USD)", RoHS=Yes, RoHS Compliant=Yes, Series=RT, Supplier=Digi-Key, Termination=SMD/SMT, Width=0.031inch
R20: library part RC0603FR-07100RL, "RES SMD 100 OHM 1% 1/10W 0603", Case Code (Imperial)=0603, Case Code (Metric)=1608, LCSC Part Number=C105588, Manufacturer=Yageo, Max Operating Temperature=155°C, Max Power Dissipation=100mW, Min Operating Temperature=-55°C, Resistance Tolerance=1%, Resistor Type="Thick Film", Temperature Coefficient=100ppm/°C, Voltage Rating=50V, Case/Package=0603, Category="Chip SMD Resistors", Construction=Rectangular, Depth=0.8mm, Features="Moisture Resistant", Height=0.45mm, Item Type=Resistor, Lead Free="Lead Free", Length=1.6mm, Manufacturer Part Number=RC0603FR-07100RL, Military Standard=Not, Number of Pins=2, Number of Terminations=2, Packaging="Tape and Reel", Power Rating=100mW, Pricing 1="5000=0.00300, 5000=0.00200, 5000=0.00450, 50000=0.00410, 500000=0.00230, 2500000=0.00140 (USD)", REACH SVHC=Unknown, Resistance=100R, RoHS=Yes, RoHS Compliant=Yes, Series=RC, Size Code=0603, Stock 1=3800000, Supplier 1="Arrow Electronics", Supplier Part Number 1=RC0603FR-07100RL, Technology="THICK FILM", Termination=SMD/SMT, Tolerance=1%, Voltage Rating (DC)=50V, Width=0.8mm
SW1 SW2: "SWITCH TACTILE SPST-NO 0.05A 12V", Contact Current Rating=50mA, Contact Resistance=100mR, Insulation Resistance=100MR, LCSC Part Number=C231329, Manufacturer=Omron, Max Operating Temperature=70°C, Max Voltage Rating (DC)=12V, Min Operating Temperature=-25°C, Operating Force=1.5N, Package Quantity=1, Ratings="Dust Proof,IP40", Supplier Part Number 1=SW1020DKR-ND, Actuator Length=0.4mm, Actuator Type=Standard, ComponentLink1Description=http://www.farnell.com/datasheets/60838.pdf?src-supplier=Farnell, ComponentLink1URL=http://www.farnell.com/datasheets/60838.pdf?src-supplier=Farnell, ComponentLink2Description=http://www.farnell.com/datasheets/60838.pdf?src-supplier=Element14, ComponentLink2URL=http://www.farnell.com/datasheets/60838.pdf?src-supplier=Element14, ComponentLink3Description=https://omronfs.omron.com/en_US/ecb/products/pdf/en-b3u.pdf?src-supplier=Digi-Key, ComponentLink3URL=https://omronfs.omron.com/en_US/ecb/products/pdf/en-b3u.pdf?src-supplier=Digi-Key, ComponentLink4Description=http://www.omron.com/ecb/products/pdf/en-b3u.pdf?src-supplier=Digi-Key, ComponentLink4URL=http://www.omron.com/ecb/products/pdf/en-b3u.pdf?src-supplier=Digi-Key, ComponentLink5Description=https://www.distrelec.biz/Web/Downloads/he/et/B3U_eng_datasheet.pdf?mime=application%2Fpdf&src-supplier=Distrelec, ComponentLink5URL=https://www.distrelec.biz/Web/Downloads/he/et/B3U_eng_datasheet.pdf?mime=application%2Fpdf&src-supplier=Distrelec, ComponentLink6Description=http://www.onlinecomponents.com/productFiles/mf-OM/en-b3u.pdf?src-supplier=Onlinecomponents.com, ComponentLink6URL=http://www.onlinecomponents.com/productFiles/mf-OM/en-b3u.pdf?src-supplier=Onlinecomponents.com, ComponentLink7Description=https://www.verical.com/server-webapp/html/getDatasheet?partID=552554&src-supplier=Verical, ComponentLink7URL=https://www.verical.com/server-webapp/html/getDatasheet?partID=552554&src-supplier=Verical, ComponentLink8Description=http://www.farnell.com/datasheets/1685550.pdf?src-supplier=Element14, ComponentLink8URL=http://www.farnell.com/datasheets/1685550.pdf?src-supplier=Element14, ComponentLink9Description=http://www.farnell.com/datasheets/2610940.pdf?src-supplier=Farnell, ComponentLink9URL=http://www.farnell.com/datasheets/2610940.pdf?src-supplier=Farnell, ComponentLink10Description=https://www.alliedelec.com/m/d/4c8a9ef82804fc3c241a13c1e298fd73.pdf?src-supplier=Allied+Electronics, ComponentLink10URL=https://www.alliedelec.com/m/d/4c8a9ef82804fc3c241a13c1e298fd73.pdf?src-supplier=Allied+Electronics, Contact Material=Silver, Current Rating=50mA, Depth=2.5mm, Electrical Life=200000Cycles, Height=1.2mm, Illumination Type=Non-Illuminated,Illuminated, Item Type=Switch, Lead Free="Lead Free", Length=4mm, Manufacturer Part Number=B3U-1000P, Max Current Rating=50mA, Mechanical Life=200000Cycles, Mount="Surface Mount", Orientation=Straight, Packaging="Tape and Reel", Pricing 1="1=1, 10=0.961, 25=0.9064, 50=0.7976, 100=0.7251, 250=0.68888, 500=0.67074, 1000=0.52571 (USD)", REACH SVHC=Unknown, Stock 1=116454, Supplier 1=Digi-Key, Switch Function=Off-Mom, Switch Travel=0.15mm, Termination=SMD/SMT, Throw Configuration=SPST, Voltage Rating (DC)=12V, Weight=0.000776oz, Width=3mm
U1: "IC MCU 32BIT EXT MEM 196LFBGA", Manufacturer="NXP Semiconductors", Supplier Part Number=568-MIMXRT1062DVJ6B-ND, Category=Uncategorized, Manufacturer Part Number=MIMXRT1062DVJ6B, Pricing="1=15.93, 10=12.734, 189=10.75497, 567=10.68896, 945=10.09187 (USD)", RoHS=Yes, Stock=1142, Supplier=Digi-Key
U2: "IC FLASH 64MBIT SPI/QUAD 8SOIC", Case/Package=SOIC, Frequency=133MHz, LCSC Part Number=C5362615, Manufacturer=Winbond, Max Operating Temperature=85°C, Min Operating Temperature=-40°C, Supplier Part Number=1882666P, Category=Flash, ComponentLink1Description=http://www.winbond.com/resource-files/w25q64jv%20revj%2003272018%20plus.pdf?src-supplier=Digi-Key, ComponentLink1URL=http://www.winbond.com/resource-files/w25q64jv%20revj%2003272018%20plus.pdf?src-supplier=Digi-Key, Item Type=IC, Manufacturer Part Number=W25Q64JVSSIM, Memory Format=Non-Volatile,FLASH, Memory Size=64Mb, Mounting Technology="Surface Mount", Packaging=Rail/Tube, Pricing="20=0.818, 50=0.796, 100=0.776, 250=0.756 (GBP)", RoHS=Yes, RoHS Compliant=Yes, Series=SpiFlash®, Stock=300, Supplier=Rs
U3: "IC MCU 32BIT 32KB FLASH 16QFN", Manufacturer="NXP USA", Supplier Part Number=49X9712, Manufacturer Part Number=MKL02Z32VFG4, RoHS=No, Supplier=Newark
U4: "IC EEPROM 64KBIT I2C 8UFDFPN", LCSC Part Number=C283446, Manufacturer=STMicroelectronics, Supplier Part Number=511-M24C64-FMC6TG, Category=EEPROM, ComponentLink1Description=https://datasheet.ciiva.com/1911/cd00259166-1911984.pdf?src-supplier=Digi-Key, ComponentLink1URL=https://datasheet.ciiva.com/1911/cd00259166-1911984.pdf?src-supplier=Digi-Key, Item Type=IC, Manufacturer Part Number=M24C64-FMC6TG, Pricing="1=0.41, 10=0.372, 50=0.372, 100=0.335, 1000=0.301, 10000=0.255 (USD)", RoHS=Yes, Stock=25767, Supplier=Mouser
U5 U6 U7: "IC MOTOR DRIVER PAR 16HTSSOP", LCSC Part Number=C50506, Manufacturer="Texas Instruments", Supplier Part Number=296-29434-1-ND, Category="Motor Drivers", ComponentLink1Description=https://datasheet.ciiva.com/22697/1769096-22697185.pdf?src-supplier=Element14, ComponentLink1URL=https://datasheet.ciiva.com/22697/1769096-22697185.pdf?src-supplier=Element14, ComponentLink2Description=https://datasheet.ciiva.com/3229/drv8833-3229712.pdf?src-supplier=Avnet, ComponentLink2URL=https://datasheet.ciiva.com/3229/drv8833-3229712.pdf?src-supplier=Avnet, ComponentLink3Description=https://datasheet.ciiva.com/15109/getdatasheetpartid-344250-15109480.pdf?src-supplier=Verical, ComponentLink3URL=https://datasheet.ciiva.com/15109/getdatasheetpartid-344250-15109480.pdf?src-supplier=Verical, ComponentLink4Description=https://datasheet.ciiva.com/1500/1857491-1500620.pdf?src-supplier=Element14, ComponentLink4URL=https://datasheet.ciiva.com/1500/1857491-1500620.pdf?src-supplier=Element14, ComponentLink5Description=https://datasheet.ciiva.com/1958/drv8833-1958713.pdf?src-supplier=Digi-Key, ComponentLink5URL=https://datasheet.ciiva.com/1958/drv8833-1958713.pdf?src-supplier=Digi-Key, ComponentLink6Description=https://datasheet.ciiva.com/1958/drv8833-1958714.pdf?src-supplier=Digi-Key, ComponentLink6URL=https://datasheet.ciiva.com/1958/drv8833-1958714.pdf?src-supplier=Digi-Key, ComponentLink7Description=https://datasheet.ciiva.com/1958/drv8833-1958715.pdf?src-supplier=Digi-Key, ComponentLink7URL=https://datasheet.ciiva.com/1958/drv8833-1958715.pdf?src-supplier=Digi-Key, Item Type=IC, Manufacturer Part Number=DRV8833PWPR, Pricing="1=2.5, 10=2.246, 25=2.1184, 100=1.8049, 250=1.6948, 500=1.48294, 1000=1.22872 (USD)", RoHS=Yes, Stock=4877, Supplier=Digi-Key
U8: "IC REG BUCK 3.3V 2A TSOT26", LCSC Part Number=C780769, Manufacturer=Diodes, Supplier Part Number=6109504, Category="Voltage Regulators - Switching", ComponentLink1Description=https://www.diodes.com/assets/Datasheets/AP63200-AP63201-AP63203-AP63205.pdf?src-supplier=Digi-Key, ComponentLink1URL=https://www.diodes.com/assets/Datasheets/AP63200-AP63201-AP63203-AP63205.pdf?src-supplier=Digi-Key, Item Type=IC, Manufacturer Part Number=AP63203WU-7, Pricing="3000=0.34, 6000=0.335, 9000=0.33, 12000=0.33, 15000=0.32 (USD)", RoHS=Yes, Stock=3000, Supplier="Future Electronics"
U9: "IC SUPERVISOR 1 CHANNEL 5VSOF", Case/Package=VSOF, LCSC Part Number=C509824, Manufacturer=Rohm, Max Operating Temperature=105°C, Max Power Dissipation=210mW, Max Reset Threshold Voltage=6.09V, Max Supply Current=1.98uA, Max Supply Voltage=10V, Min Operating Temperature=-40°C, Min Reset Threshold Voltage=5.91V, Min Supply Voltage=1.2V, Number of Voltages Monitored=1, Operating Supply Current=900nA, Package Quantity=3000, Supplier Part Number 1=BD4860FVE-CT-ND, Threshold Voltage=6V, Accuracy=1%, Category="Voltage Supervisors", ComponentLink1Description=https://datasheet.ciiva.com/1974/bd48xxg-e-1974994.pdf?src-supplier=Digi-Key, ComponentLink1URL=https://datasheet.ciiva.com/1974/bd48xxg-e-1974994.pdf?src-supplier=Digi-Key, ComponentLink2Description=https://datasheet.ciiva.com/8133/bd48xxg-e-8133113.pdf?src-supplier=Avnet, ComponentLink2URL=https://datasheet.ciiva.com/8133/bd48xxg-e-8133113.pdf?src-supplier=Avnet, Item Type=IC, Lead Free="Lead Free", Manufacturer Part Number=BD4860FVE-TR, Mounting Technology="Surface Mount", Number of Monitored Inputs=1, Packaging="Tape and Reel", Pins=5, Pricing 1="1=0.64000, 10=0.54900, 25=0.51200, 100=0.40960, 250=0.38032, 500=0.32182, 1000=0.24868 (USD)", Reset="Active Low", RoHS=Yes, RoHS Compliant=Yes, Series=BD48xxx, Stock 1=5990, Supplier 1=Digi-Key, Type="Simple Reset/Power-On Reset,Voltage Detector", Watchdog Timer=No
U11: "IC REG BUCK ADJUSTABLE 6A 14VQFN", Case/Package=QFN, LCSC Part Number=C263274, Manufacturer="Texas Instruments", Max Input Voltage=17V, Max Operating Temperature=150°C, Max Output current=6A, Max Output Voltage=15V, Min Input Voltage=1.6V, Min Operating Temperature=-40°C, Min Output Voltage=800mV, Min Supply Voltage=4.5V, Package Quantity=3000, Quiescent Current=600uA, Supplier Part Number 1=296-28831-1-ND, Switching Frequency=1.6MHz, Category="Voltage Regulators - Switching", ComponentLink1Description=https://datasheet.ciiva.com/2026/tps54620-2026364.pdf?src-supplier=Digi-Key, ComponentLink1URL=https://datasheet.ciiva.com/2026/tps54620-2026364.pdf?src-supplier=Digi-Key, ComponentLink2Description=https://datasheet.ciiva.com/22716/1781687-22716300.pdf?src-supplier=Element14, ComponentLink2URL=https://datasheet.ciiva.com/22716/1781687-22716300.pdf?src-supplier=Element14, ComponentLink3Description=https://datasheet.ciiva.com/2026/tps54620-2026365.pdf?src-supplier=Digi-Key, ComponentLink3URL=https://datasheet.ciiva.com/2026/tps54620-2026365.pdf?src-supplier=Digi-Key, ComponentLink4Description=https://datasheet.ciiva.com/26101/tps54620-26101515.pdf?src-supplier=Avnet+Europe, ComponentLink4URL=https://datasheet.ciiva.com/26101/tps54620-26101515.pdf?src-supplier=Avnet+Europe, ComponentLink5Description=https://datasheet.ciiva.com/3221/tps54620-3221357.pdf?src-supplier=Avnet, ComponentLink5URL=https://datasheet.ciiva.com/3221/tps54620-3221357.pdf?src-supplier=Avnet, ComponentLink6Description=https://datasheet.ciiva.com/2026/tps54620-2026366.pdf?src-supplier=Digi-Key, ComponentLink6URL=https://datasheet.ciiva.com/2026/tps54620-2026366.pdf?src-supplier=Digi-Key, Contact Plating=Gold, Height=0.95mm, Item Type=IC, Lead Free="Lead Free", Length=3.65mm, Manufacturer Part Number=TPS54620RHLR, Mount="Surface Mount", Number of Outputs=1, Number of Pins=14, Operating Supply Voltage=17V, Output Current=6A, Output Type=Adjustable, Output Voltage=15V, Packaging="Tape and Reel", Pricing 1="1=5.80000, 10=5.20700, 25=4.92280, 100=4.26630, 250=4.04752, 500=3.63182, 1000=3.61200 (USD)", Radiation Hardening=No, REACH SVHC="No SVHC", RoHS=Yes, RoHS Compliant=Yes, Series=SWIFT™, Supplier 1=Digi-Key, Synchronous Rectifier=Yes, Width=3.65mm
X1: library part X322524MOB4SI, "24MHz SMD Crystal Resonator 12pF ±10ppm ±30ppm -40℃~+85℃ SMD3225-4P Crystals ROHS", LCSC Part Number=C70590, Manufacturer="Yangxing Tech", ComponentLink1Description=LCSC, ComponentLink1URL=https://www.lcsc.com/product-detail/Crystals_Yangxing-Tech-X322524MOB4SI_C70590.html, Item Type=Crystal, Manufacturer Part Number=X322524MOB4SI
X2: library part NX3215SA-32.768K-STD-MUA-8, "CRYSTAL 32.7680KHZ 12.5PF SMD", Case/Package=SMD/SMT, ESR (Equivalent Series Resistance)=70kR, Frequency=32.768kHz, Frequency Tolerance=20ppm, LCSC Part Number=C156245, Load Capacitance=12.5pF, Manufacturer=NDK, Max Operating Temperature=85°C, Min Operating Temperature=-40°C, Package Quantity=1000, Supplier Part Number 1=644-1156-6-ND, ComponentLink1Description=https://media.digikey.com/pdf/Data%20Sheets/NDK%20PDFs/NX3215SA-32.768K-STD-MUA-8.pdf?src-supplier=Digi-Key, ComponentLink1URL=https://media.digikey.com/pdf/Data%20Sheets/NDK%20PDFs/NX3215SA-32.768K-STD-MUA-8.pdf?src-supplier=Digi-Key, ComponentLink2Description=http://www.ndk.com/images/products/catalog/c_NX3215SA-STD-MUA-14_e.pdf?src-supplier=Digi-Key, ComponentLink2URL=http://www.ndk.com/images/products/catalog/c_NX3215SA-STD-MUA-14_e.pdf?src-supplier=Digi-Key, Height=0.035inch, Lead Free="Lead Free", Length=0.126inch, Manufacturer Part Number=NX3215SA-32.768K-STD-MUA-8, Mount="Surface Mount", Number of Pins=2, Packaging="Tape and Reel", Pricing 1="1=0.68, 10=0.602, 50=0.5628, 100=0.4974, 500=0.47124, 1000=0.3927 (USD)", Stock 1=29951, Supplier 1=Digi-Key, Width=0.059inch

## Free pads (board coordinates)
  round 78.74 hole 78.74 unplated: 10(0,0) 10(0,1473) 10(1450,0) 10(1450,1470)

## Via types
v1: diameter 17.72, hole 7.87, Top Layer to Bottom Layer, tented both sides, 254 vias
v2: diameter 11.81, hole 7.87, Top Layer to Bottom Layer, tented both sides, 88 vias

## Nets (pads, with @x,y where several pads share a name; then routed paths per layer and width w, separated by ;. In a path a pad name is that pad's centre, name@x,y a point inside that pad or via, vN(x,y) a via of type N, cw(c..) or ccw(c..) an arc to the next point about the centre after c; other vN are vias at no path point)
3V3: C8.2 C9.2 C10.2 C11.2 C12.2 C13.2 C14.2 C15.2 C16.2 C17.2 C18.2 C19.2 C20.2 C21.2 C22.2 C23.2 C61.2 C62.2 D1.2 FB2.1 J1.3 J2.3 J3.3 J4.3 J5.3 J6.3 L2.2 LED1.1 LED2.1 U1.E6 U1.E9 U1.F5 U1.F10 U1.J6 U1.J10 U1.K4 U1.K5 U1.N14 U1.P12 U2.8 U3.1 U4.8 U8.1 | length 5306.7
  Top Layer w5: v2(827.5,898.23) 828.14,898.23 843.89,882.48 U1.F5@844.53,882.48 ; v2(860.64,930.36) 860.64,929.86 876.02,914.48 U1.E6@876.02,913.98 ; U1.J6@876.02,787.99 U1.J6@876.53,787.99 ; v2(986.26,929.72) U1.E9@970.51,913.98 1000.49,884 U1.F10@1002,884 ; U1.J10@1002.01,787.99 v2(1017.76,772.24) ; U1.P12@1065,630.51 1065,629.76 1081,613.76 v2(1081,613)
  Top Layer w8: U3.1@1070.83,1211.68 1073.73,1211.68 U3.1@1074.65,1212.61
  Top Layer w10: v1(623.22,852) 637,852 653,836 653,817.96 654,816.96 C23.2@652.04,815 ; v2(797.28,740.59) 797.28,740.67 813.03,756.42 U1.K4@813.03,756.5 ; v2(828.78,740.59) 828.78,740.67 844.53,756.42 U1.K5@844.53,756.5 U1.J6@876.02,787.99 ; U1.N14@1127.99,662.01 1143,647 1224.5,647 C10.2@1225,646.5 ; LED1.1@1152.47,1342 1153.24,1342.76 1153.24,1378.24 v1(1154,1379)
  Top Layer w12: v1(623.22,570.22) FB2.1@623.22,599
  Top Layer w20: C18.2@652,1049 v1(652,1075)
  Top Layer w22: v1(1034,99) 1065,68 1164.63,68 1177.52,55.11 J5.3@1177.52,-6
  Top Layer w25: v1(-31,288) J2.3@-6,288.04 J2.3@-6,288.04 ; J1.3@-18.5,1184.5 -18,1185 v1(-6,1185) ; LED2.1@245.34,1353 246.48,1354.14 246.48,1399.48 272,1425 J3.3@272,1479 271,1480 v1(271,1485.5) ; J6.3@507.74,-6 J6.3@508.22,-6 646.22,132 v1(868,132)
  Signal 1 w8: v2@827.78,898.23 828,898.23 860.13,930.36 v2(860.64,930.36)
  Signal 1 w30: -11,476 -11,725
  Signal 2 w5: 660,725 781.54,725 797.13,740.59 v2(797.28,740.59)
  Signal 2 w8: v2(828.78,740.59) 879.24,791.06 879.24,911.76 v2@860.96,930.04 ; v2(860.64,930.36) v2@860.96,930.04 ; v1(1074.65,1231) 1074.65,1173.65 986.26,1085.26 v2(986.26,929.72) 985.94,930.04 v2@860.96,930.04
  Signal 2 w12: v1(623.22,570.22) 623.22,702.22 646,725 660,725
  Signal 2 w20: v1(455,1362.08) 455,1115 495,1075 v1(652,1075)
  Signal 2 w25: v1(-6,1185) 86,1185 119,1218 119,1447 157.5,1485.5 v1(271,1485.5) ; v1(941.3,1479) 1080,1479 1154,1405 v1(1154,1379)
  Bottom Layer w10: v1(623.22,570.22) v1@623.22,846.18 ; 867,72 C61.2@867,93 868,94 v1(868,132) ; C20.2@928.46,734.5 954.69,734.5 964.43,744.24 1015.74,744.24 C12.2@1018,746.5 ; U4.8@1092.91,826.53 1100,826.53 1100.91,827.43 1100.91,859.91 1115.14,874.14 1318.86,874.14 1336,857 1336,745 1312,721 1188.8,721 1165.31,697.51 v1(1165.31,646.57)
  Bottom Layer w20: D1.2@671.48,45 671.48,110.48 v1(694,133) ; C62.2@867,44 867,72 ; v1(1074.65,1231) 1154,1310.35 v1(1154,1379) ; v1(1106,261) 1139.29,261 U8.1@1139.49,260.8
3V3_ENABLE: R8.1 R11.2 U1.K7 U8.2 | length 881
  Top Layer w5: U1.K7@907.52,756.5 908.01,756.5 921.51,770 v2(922,770)
  Signal 1 w10: v2@922,769.51 922,517.1 1178.1,261 v1(1218.57,261)
  Signal 1 w15: v1(1104,224) 1199.57,224 1218.57,243 v1(1218.57,261)
  Bottom Layer w15: R8.1@1194.5,264.5 1196.5,264.5 R8.1@1198,266
  Bottom Layer w20: v1(1104,224) 1138.89,224 U8.2@1139.49,223.4 ; 1217.88,310.93 1218.57,310.24 1218.57,285.69
6V: C49.1 C50.1 C51.1 C52.2 C53.2 C54.2 C66.2 L3.2 P1.1 P1.3 P1.5 P1.7 P1.9 R19.2 U5.12 U6.12 U7.12 | length 1464.5
  Top Layer w10: v1@1754.14,1360.09 v1(1754.14,1362.18)
  Top Layer w12: C52.2@256.5,866 256.65,865.85 v1(256.65,843) 256.65,803.15 U5.12@256.8,803 ; U7.12@455,245.2 455.15,245.35 517.85,245.35 518,245.5 583.74,245.5 C51.1@587,248.76 ; U6.12@793,1226.2 794.8,1228 858.48,1228 ; 858.48,1228.48 858.48,1228 ; C53.2@884,1229.5 882.5,1228 858.48,1228 ; C53.2@884,1230.5 906,1230.5
  Top Layer w25: v1(256,1021.19) 256,1018 256.24,1017.76 C49.1@256.24,957 ; v1(1302,1288) 1337,1288 R19.2@1338,1287
  Top Layer w40: L3.2@1541.26,732.26 v1(1873,732.26)
  Top Layer w60: v1(1754.14,1362.18) P1.9@1873,1362.18
  Bottom Layer w10: 434,543.5 447.19,530.31 447.19,289.24 445.95,307.25
  Bottom Layer w30: 434,543.5 439,538.5 439,301.43 v1@494,246.43
  other v1: 494,245 1873,889.74 1873,1047.22 938,1182 1873,1204.7
BOOT: C47.2 U11.13 | length 46.7
  Top Layer w12: C47.2@1605,990 1605.14,990.14 1605.14,1036.42 U11.13@1605.28,1036.56
BUCK_EN: C64.2 R10.1 R12.1 U9.1 U11.10 | length 1203.6
  Top Layer w10: R12.1@1400.25,222.45 1410,232.2 1410,351.46 v1(1431.77,373.23) ; v1(1498.73,985.77) 1540.37,985.77 1546.23,991.62 U11.10@1546.23,1036.56
  Signal 2 w10: v1(1407.14,630.79) 1431.77,606.16 v1(1431.77,373.23) ; v1(1437.02,924.02) 1437.02,965.02 1457.77,985.77 v1(1498.73,985.77)
  Bottom Layer w10: v1(1407.14,630.79) 1422.35,646 1534,646 1546,658 1546,815.04 v1(1437.02,924.02) ; v1(1431.77,373.23) 1431.77,284.23 R10.1@1441,275 R10.1@1441,277.5
BUCKIN: C59.2 C60.2 D2.1 D5.1 R8.2 U8.3
ENABLE_1_2: U1.E3 U5.1 | length 922.4
  Top Layer w5: v2(765.79,929.41) 765.95,929.41 781.38,913.98 U1.E3@781.54,913.98
  Top Layer w10: U5.1@154.43,574.65 U5.1@154.72,574.37
  Top Layer w15: v1@154.72,533.83 U5.1@154.72,574.37
  Signal 2 w5: 696.41,943.66 751.85,943.66 765.79,929.72 v2(765.79,929.41)
  Signal 2 w10: v1(155,531) 155.2,531.2 155.2,547.2 179,571 293,571 313,591 313,697 559.66,943.66 696.41,943.66
ENABLE_3_4: U1.A6 U6.1 | length 917
  Top Layer w10: v1(523.83,1329) 524.04,1328.78 564.44,1328.78 U6.1@564.65,1328.57 ; U1.A6@876.02,1039.96 876.02,1061.02 989,1174 v1(989,1382)
  Signal 1 w10: v1(523.83,1329) 600,1329 653,1382 v1(989,1382)
ENABLE_5_6: U1.D2 U7.1 | length 1217.5